# Altium PCB Main_PCB.PcbDoc (part 2 of 2)
Units mil, origin at the board's own origin, x right, y up, seen from the top; angles counter-clockwise.
Board outline 2401.57 x 1732.28 mil, 2 copper layers (Top Layer, Bottom Layer), stack 57 mil thick; 86 components, 54 nets, 243 pads, 73 vias.
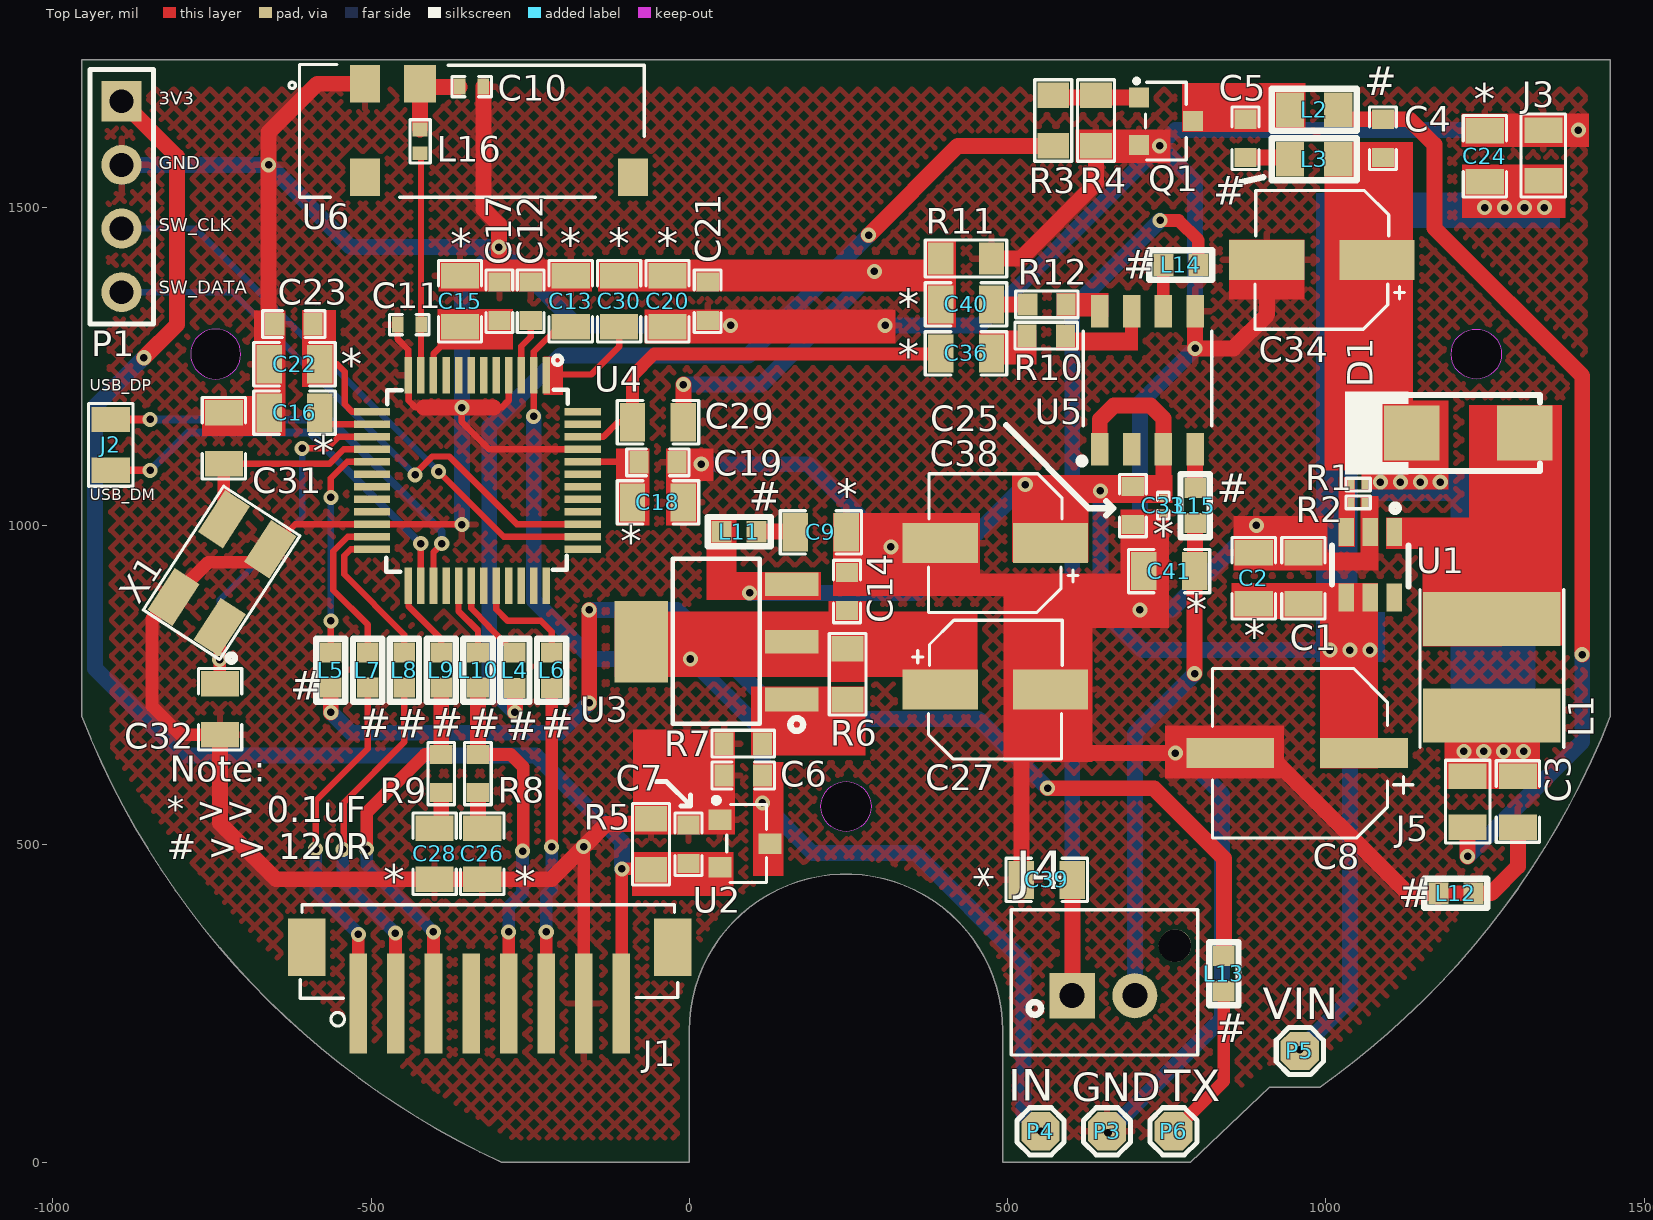
[diagram p0: Top Layer view]

## Part data (continued)
R7: library part RC0603FR-071K8L, "Res Thick Film 0603 1.8K Ohm 1% 0.1W(1/10W) ±100ppm/C Molded SMD Paper T/R", Case Code (Imperial)=0603, Case Code (Metric)=1608, Manufacturer=Yageo, Max Operating Temperature=155°C, Max Power Dissipation=100mW, Min Operating Temperature=-55°C, Package Quantity=5000, Resistance=1.8kR, Resistance Tolerance=1%, Resistor Type="Thick Film", Supplier Part Number 1=311-1.80KHRCT-ND, Temperature Coefficient=100ppm/°C, Voltage Rating=50V, Case/Package=0603, Category="Chip SMD Resistors", ComponentLink1Description=https://datasheet.ciiva.com/11808/0900766b80f96399-11808105.pdf?src-supplier=RSComponents, ComponentLink1URL=https://datasheet.ciiva.com/11808/0900766b80f96399-11808105.pdf?src-supplier=RSComponents, ComponentLink2Description=https://datasheet.ciiva.com/2519/pyu-r-int-thick-7-2519189.pdf?src-supplier=Digi-Key, ComponentLink2URL=https://datasheet.ciiva.com/2519/pyu-r-int-thick-7-2519189.pdf?src-supplier=Digi-Key, ComponentLink3Description=https://datasheet.ciiva.com/7746/443971-7746277.pdf?src-supplier=Element14, ComponentLink3URL=https://datasheet.ciiva.com/7746/443971-7746277.pdf?src-supplier=Element14, ComponentLink4Description=https://datasheet.ciiva.com/2519/pyu-r-int-thick-7-2519190.pdf?src-supplier=Digi-Key, ComponentLink4URL=https://datasheet.ciiva.com/2519/pyu-r-int-thick-7-2519190.pdf?src-supplier=Digi-Key, ComponentLink5Description=https://datasheet.ciiva.com/7746/443971-7746278.pdf?src-supplier=Element14, ComponentLink5URL=https://datasheet.ciiva.com/7746/443971-7746278.pdf?src-supplier=Element14, ComponentLink6Description=https://datasheet.ciiva.com/12558/rc0603-272842-12558694.pdf?src-supplier=Mouser, ComponentLink6URL=https://datasheet.ciiva.com/12558/rc0603-272842-12558694.pdf?src-supplier=Mouser, ComponentLink7Description=https://datasheet.ciiva.com/2519/pyu-r-int-thick-7-2519191.pdf?src-supplier=Digi-Key, ComponentLink7URL=https://datasheet.ciiva.com/2519/pyu-r-int-thick-7-2519191.pdf?src-supplier=Digi-Key, Construction=Rectangular, Depth=0.8mm, Features="Moisture Resistant", Height=0.45mm, Lead Free="Lead Free", Length=1.6mm, Manufacturer Part Number=RC0603FR-071K8L, Military Standard=Not, Number of Pins=2, Number of Terminations=2, Packaging="Tape and Reel", Power Rating=100mW, Pricing 1="1=0.10000, 10=0.02400, 100=0.00970, 1000=0.00436, 2500=0.00378 (USD)", REACH SVHC="No SVHC", RoHS=Yes, RoHS Compliant=Yes, Series=RC, Size Code=0603, Stock 1=827154, Supplier 1=Digi-Key, Technology="THICK FILM", Termination=SMD/SMT, Tolerance=1%, Voltage Rating (DC)=50V, Width=0.8mm
R8 R9: library part RC0603JR-0710RL, "RES SMD 10R 0.1W 0603", Case Code (Imperial)=0603, Case Code (Metric)=1608, Manufacturer=Yageo, Max Operating Temperature=155°C, Max Power Dissipation=100mW, Min Operating Temperature=-55°C, Resistance Tolerance=5%, Resistor Type="Thick Film", Supplier Part Number 1=311-10GRCT-ND, Temperature Coefficient=200ppm/°C, Voltage Rating=50V, Case/Package=0603, Category="Chip SMD Resistors", ComponentLink1Description=https://datasheet.ciiva.com/46395/443971-46395069.pdf?src-supplier=Element14, ComponentLink1URL=https://datasheet.ciiva.com/46395/443971-46395069.pdf?src-supplier=Element14, ComponentLink2Description=https://datasheet.ciiva.com/7746/443971-7746431.pdf?src-supplier=Element14, ComponentLink2URL=https://datasheet.ciiva.com/7746/443971-7746431.pdf?src-supplier=Element14, Construction=Rectangular, Depth=0.8mm, Features="Moisture Resistant", Lead Free="Lead Free", Length=1.6mm, Manufacturer Part Number=RC0603JR-0710RL, Military Standard=Not, Number of Pins=2, Number of Terminations=2, Packaging="Tape and Reel", Power Rating=100mW, Pricing 1="1=0.10000, 10=0.04000, 100=0.01620, 1000=0.00728, 2500=0.00632 (USD)", REACH SVHC="No SVHC", Resistance=10R, RoHS=Yes, RoHS Compliant=Yes, Series=RC, Size Code=0603, Stock 1=1146672, Supplier 1=Digi-Key, Termination=SMD/SMT, Tolerance=5%, Voltage Rating (DC)=50V, Width=0.8mm
R10 R12: library part RC0603JR-0747KL, "RES SMD 47K OHM 5% 1/10W 0603", Case Code (Imperial)=0603, Case Code (Metric)=1608, Manufacturer=Yageo, Max Operating Temperature=155°C, Min Operating Temperature=-55°C, Package Quantity=5000, Power Rating=100mW, Resistance=47kR, Temperature Coefficient=100ppm/°C, Tolerance=5%, Voltage Rating=50V, Case/Package=0603, ComponentLink1Description=http://www.farnell.com/datasheets/443971.pdf, ComponentLink1URL=http://www.farnell.com/datasheets/443971.pdf, ComponentLink2Description=http://www.mouser.com/catalog/specsheets/RC0603.pdf, ComponentLink2URL=http://www.mouser.com/catalog/specsheets/RC0603.pdf, Composition="Thick Film", Depth=0.8mm, Height=0.45mm, Lead Free="Lead Free", Length=1.6mm, Manufacturer Part Number=RC0603JR-0747KL, Military Standard=Not, Number of Pins=2, Packaging="Tape and Reel", Pricing 1="5000=0.0025, 10000=0.0022, 25000=0.0019, 1=0.0011, 6000=0.001 (USD)", REACH SVHC="No SVHC", Stock 1=599135, Supplier 1=Arrow, Supplier Part Number 1=RC0603JR-0747KL, Termination=SMD/SMT, Voltage Rating (DC)=50V, Width=0.8mm
R11: library part RC0805FR-070RL, "Res Thick Film 0805 0 Ohm Epoxy Pad SMD T/R", Case Code (Imperial)=0805, Case Code (Metric)=2012, Manufacturer=Yageo, Max Operating Temperature=155°C, Max Power Dissipation=125mW, Min Operating Temperature=-55°C, Resistance=0mR, Resistor Type="Thick Film", Tolerance=1%, Case/Package=0805, Category="Chip SMD Resistors", ComponentLink1Description=https://datasheet.ciiva.com/17042/rc0805-17042698.pdf?src-supplier=Future+Electronics, ComponentLink1URL=https://datasheet.ciiva.com/17042/rc0805-17042698.pdf?src-supplier=Future+Electronics, ComponentLink2Description=https://datasheet.ciiva.com/15189/getdatasheetpartid-348154-15189885.pdf?src-supplier=Verical, ComponentLink2URL=https://datasheet.ciiva.com/15189/getdatasheetpartid-348154-15189885.pdf?src-supplier=Verical, Construction=Rectangular, Contact Plating=Tin,Matte, Depth=1.25mm, Features="Moisture Resistant", Lead Free="Lead Free", Length=2mm, Manufacturer Part Number=RC0805FR-070RL, Military Standard=Not, Number of Terminations=2, Packaging="Tape and Reel", Power Rating=125mW, Pricing 1="5000=0.00285, 10000=0.00281, 20000=0.00273, 30000=0.00267, 40000=0.00257, 50000=0.00251, 500000=0.00245 (USD)", Radiation Hardening=No, RoHS=Yes, RoHS Compliant=Yes, Series=RC, Size Code=0805, Stock 1=320000, Supplier 1=Avnet, Supplier Part Number 1=RC0805FR-070RL
U1: "24V 2A SOT-23-6 DC-DC Converters RoHS", Manufacturer=SHOUDING, Package=SOT-23-6, ComponentLink1Description="Supplier link", ComponentLink1URL=https://lcsc.com/product-detail/DC-DC-Converters_SDB628_C77805.html, Manufacturer Part No=SDB628
U2: "IC REG LINEAR 3.3V 200MA SOT23", Case/Package=TO-236-3, Dropout Voltage=680mV, Manufacturer=Torex, Max Input Voltage=6V, Max Operating Temperature=85°C, Max Supply Current=3uA, Min Operating Temperature=-40°C, Min Output Voltage=3.3V, Output Current=200mA, Category="Voltage Regulators - Linear", ComponentLink1Description=https://www.torexsemi.com/file/xc6206/XC6206.pdf?src-supplier=Digi-Key, ComponentLink1URL=https://www.torexsemi.com/file/xc6206/XC6206.pdf?src-supplier=Digi-Key, Manufacturer Part Number=XC6206P332MR-G, Mount="Surface Mount", Number of Regulators=1, Output Configuration=Positive, Output Type=Fixed, Pricing 1="3000=0.23146, 6000=0.22820, 12000=0.22168, 18000=0.21679, 24000=0.20864, 30000=0.20375, 300000=0.19886 (USD)", Quiescent Current=3uA, RoHS=Yes, RoHS Compliant=Yes, Supplier 1=Avnet, Supplier Part Number 1=XC6206P332MR-G
U3: "PMIC - LDO voltage regulator Texas Instruments LM1117MPX-ADJ/NOPB Positivbe, adjustable SOT 223", Case/Package=SOT-223, Current Rating=800mA, Dropout Voltage=1.2V, Manufacturer="TI National Semiconductor", Max Input Voltage=15V, Max Operating Temperature=125°C, Max Output Voltage=13.8V, Max Supply Current=10mA, Min Input Voltage=2.6V, Min Operating Temperature=0°C, Min Output Voltage=1.25V, Output Voltage Accuracy=1%, Package Quantity=2000, Power Supply Rejection Ratio (PSRR)=75dB, Quiescent Current=5mA, Reference Voltage=1.262V, Supplier Part Number 1=926-LM1117MPXADJNOPB, Accuracy=1%, Category="Voltage Regulators - Linear", ComponentLink1Description=https://datasheet.ciiva.com/15111/getdatasheetpartid-55626-15111244.pdf?src-supplier=Verical, ComponentLink1URL=https://datasheet.ciiva.com/15111/getdatasheetpartid-55626-15111244.pdf?src-supplier=Verical, ComponentLink2Description=https://datasheet.ciiva.com/3223/lm1117-n-3223530.pdf?src-supplier=Avnet, ComponentLink2URL=https://datasheet.ciiva.com/3223/lm1117-n-3223530.pdf?src-supplier=Avnet, ComponentLink3Description=https://datasheet.ciiva.com/3223/lm1117-n-3223531.pdf?src-supplier=Avnet, ComponentLink3URL=https://datasheet.ciiva.com/3223/lm1117-n-3223531.pdf?src-supplier=Avnet, ComponentLink4Description=https://datasheet.ciiva.com/6596/lm1117-n-6596777.pdf?src-supplier=Digi-Key, ComponentLink4URL=https://datasheet.ciiva.com/6596/lm1117-n-6596777.pdf?src-supplier=Digi-Key, ComponentLink5Description=https://datasheet.ciiva.com/6596/lm1117-n-6596778.pdf?src-supplier=Digi-Key, ComponentLink5URL=https://datasheet.ciiva.com/6596/lm1117-n-6596778.pdf?src-supplier=Digi-Key, ComponentLink6Description=https://datasheet.ciiva.com/6596/lm1117-n-6596779.pdf?src-supplier=Digi-Key, ComponentLink6URL=https://datasheet.ciiva.com/6596/lm1117-n-6596779.pdf?src-supplier=Digi-Key, ComponentLink7Description=https://datasheet.ciiva.com/25980/lm1117-n-25980333.pdf?src-supplier=Avnet+Europe, ComponentLink7URL=https://datasheet.ciiva.com/25980/lm1117-n-25980333.pdf?src-supplier=Avnet+Europe, ComponentLink8Description=https://datasheet.ciiva.com/22710/lm1117-n-22710935.pdf?src-supplier=Element14, ComponentLink8URL=https://datasheet.ciiva.com/22710/lm1117-n-22710935.pdf?src-supplier=Element14, Contact Plating=Tin,Matte, Lead Free="Lead Free", Manufacturer Part Number=LM1117MPX-ADJ/NOPB, Max Output Current=800mA, Min Current Limit=800mA, Mount="Surface Mount", Number of Outputs=1, Number of Pins=4, Number of Regulators=1, Output Configuration=Positive, Output Current=800mA, Output Type=Adjustable, Output Voltage=13.8V, Packaging="Tape and Reel", Polarity=Positive, Pricing 1="1=1.28000, 10=1.15000, 50=1.09000, 100=0.89500, 1000=0.58400, 10000=0.53200 (USD)", Radiation Hardening=No, REACH SVHC="No SVHC", RoHS=Yes, Series=-, Stock 1=273, Supplier 1=Mouser
U4: "High Performance 32-bit Bluetooth Audio P", Manufacturer="MV Silicon", Package=LQFP48, Pitch=0.5mm
U5: "Class D, Class AB 1-Channel (Mono) 11W x 1 @ 4Ω, 9W x 1 @ 4Ω 3V ~ 9V SOP-8_EP_150mil Audio Power OpAmps RoHS", Manufacturer=Manufacturer, Max Output Power x Channels @ Load="11W x 1 @ 4Ω, 9W x 1 @ 4Ω", Package=SOP-8_EP_150mil, Voltage - Supply="3V ~ 9Vv", Features="Overcurrent Protection, Thermal, Undervoltage Protection", Output Type="1-Channel (Mono)", Type="Class D, Class AB"
U6: "RF ANT 2.4GHZ STAMPED MET SLD", Manufacturer=Proant, Supplier Part Number 1=1532-1001-6-ND, ComponentLink1Description=https://media.digikey.com/pdf/Data%20Sheets/Proant%20PDF's/PRO-OB-440_Dwg.PDF?src-supplier=Digi-Key, ComponentLink1URL=https://media.digikey.com/pdf/Data%20Sheets/Proant%20PDF's/PRO-OB-440_Dwg.PDF?src-supplier=Digi-Key, ComponentLink2Description=http://www.proant.se/files/user/Application%20note%20-%20OnBoard%20SMD%20GNSS%20rev%202.0.pdf?src-supplier=Digi-Key, ComponentLink2URL=http://www.proant.se/files/user/Application%20note%20-%20OnBoard%20SMD%20GNSS%20rev%202.0.pdf?src-supplier=Digi-Key, ComponentLink3Description=http://www.proant.se/files/user/Documents/Datasheet%20-%20OnBoard%20SMD%202400%20MHz%20rev%203.pdf?src-supplier=Digi-Key, ComponentLink3URL=http://www.proant.se/files/user/Documents/Datasheet%20-%20OnBoard%20SMD%202400%20MHz%20rev%203.pdf?src-supplier=Digi-Key, Manufacturer Part Number=PRO-OB-440, Mount="Surface Mount", Number of Bands=1, Packaging="Cut Tape", Pricing 1="1=0.74, 10=0.647, 25=0.608, 100=0.4964, 250=0.46104, 500=0.39238 (USD)", Return Loss=-10dB, Stock 1=23502, Supplier 1=Digi-Key, Termination=Solder
X1: library part 7I24000F20UCG, "24MHz ±20ppm 20pF 40Ω SMD-5032_4P Crystals RoHS", ESR (Equivalent Series Resistance)=40Ω, Frequency Tolerance=±20ppm, Load Capacitance=20pF, Manufacturer="SJK(SHENZHEN CRYSTAL TECH)", Operating Temperature=-40℃~+85℃, Package=SMD-5032_4P, Crystal Type="Passive SMD Crystal", Frequency=24MHz

## Via types
v1: diameter 23.62, hole 11.81, Top Layer to Bottom Layer, 73 vias

## Nets (pads, with @x,y where several pads share a name; then routed paths per layer and width w, separated by ;. In a path a pad name is that pad's centre, name@x,y a point inside that pad or via, vN(x,y) a via of type N, cw(c..) or ccw(c..) an arc to the next point about the centre after c; other vN are vias at no path point)
3V3: C7.1 J1.8 P1.1 R5.2 U2.2 | length 2223.2
  Top Layer w20: J1.8@-106.71,248.42 -106.35,248.77 -106.35,460.65 v1(-106,461) -61.62,461 R5.2
  Top Layer w25: P1.1 -805,1580 -805,1316 v1(-857,1264)
  Bottom Layer w25: v1(-857,1264) -934,1187 -934,776 -797,639 -241,639 -106,504 v1(-106,461)
ADJ: R6.2 R7.2 U3.1 | length 88
  Top Layer w25: 160.83,686.17 248.21,686.17 248.66,685.72
ANT: C11.1 L16.2 U4.11 | length 350
  Top Layer w10: C11.1@-423,1305.5 C11.1@-422.5,1305 ; L16.2 -421.69,1583.99 U4.11
AVD33: C20.1 C21.1 C29.1 C30.1 C40.1 R11.2 | length 814.9
  Top Layer w25: C29.1 v1(-9.34,1221.72) ; C21.1 46.66,1400.72 47.66,1399.72 v1(290.66,1399.72) 374.66,1399.72 R11.2
  Bottom Layer w25: v1(-9.34,1221.72) 112.66,1221.72 v1(290.66,1399.72)
B_LED: J1.2 L8.1 | length 572.4
  Top Layer w10: v1(-544.34,491.72) -543,493.07 -543,565 -447.68,660.32 L8.1 ; v1(-462,360) v1@-461.52,359.52 ; J1.2@-461.52,248.9 J1.2@-461.04,248.42
  Top Layer w20: J1.2@-461.52,248.9 v1@-461.52,359.52
  Bottom Layer w20: v1(-544.34,491.72) -544.34,442.34 v1(-462,360) v1@-461.52,359.52
D_IN: C5.2 L2.2 Q1.3 | length 160.1
  Top Layer w25: Q1.3 793.97,1638.72 C5.2 928.62,1638.72 L2.2
FB: R1.1 R2.1 U1.3
GND: C1.2 C2.2 C3.2 C6.2 C7.2 C8.2 C9.2 C10.2 C11.2 C12.1 C13.2 C14.2 C15.2 C16.1 C17.2 C18.2 C19.2 C20.2 C21.2 C22.2 C23.2 C24.2 C25.2 C26.2 C27.2 C28.2 C31.1 C32.1 C33.2 C34.2 C38.2 C39.2 C41.2 J1.7 J3.2 L12.1 L12.2 P1.2 P3.1 Q1.2 R2.2 R4.2 R5.1 R7.1 R11.1 U1.2 U2.1 U4.4 U4.12 U4.22 U4.45 U5.5 U6.1 X1.2 X1.4 | length 10135.5
  Top Layer w10: X1.2 -619.32,1002.25 U4.22 -358.25,1002.25 v1@-358,1002 ; C11.2 -458.5,1293.5 -441.38,1276.38 U4.12 -441,1236.2 -441,1196.38 -430.34,1185.72 -417.34,1185.72 ; v1(-357.34,1185.72) -357.34,1163 -314.71,1120.36 U4.45 ; -307.93,1185.72 -294.93,1185.72 -283.9,1196.76 U4.4 ; v1(-166.03,496.03) -165.9,495.9 v1@-165.9,495.63 ; J1.7@-165.9,248.55 J1.7@-165.76,248.42
  Top Layer w20: C32.1 -799.34,671.72 -844.34,716.72 -844.34,854.22 X1.4 -755.84,942.72 X1.2@-661.34,942.72 ; J1.7@-165.9,248.55 v1@-165.9,495.63
  Top Layer w25: C32.1 -737.34,532.72 -649.34,444.72 C28.2 C26.2 -216.8,444.72 v1@-165.9,495.63 ; C23.2@-661.34,1310 -661.34,1617.66 -584.57,1694.43 U6.1 ; -417.34,1185.72 v1(-357.34,1185.72) -307.93,1185.72 ; C10.2 -323.5,1497.5 -299.34,1473.34 v1(-299.34,1437.72) -299.34,1383.72 C17.2 ; v1(-166.03,496.03) -130.34,531.72 R5.1@-60.34,531.72 ; v1(64.66,1314.72) v1(307.66,1314.72) ; R11.1 520.66,1419.72 638.66,1537.72 R4.2 ; C39.2 521.66,674.66 524,677 ; C27.2 567.27,704.11 628.66,642.72 v1(763.66,642.72) C8.2 908.28,642.72 1128.28,422.72 L12.1 L12.2 1259.66,422.72 1301.66,464.72 C3.2 ; C41.2@696.66,945.72 C41.2 ; U5.5 v1(794.66,1278.72) 854.66,1278.72 907.66,1331.72 907.66,1368.72 ; J3.2@1340.66,1620.72 J3.2
  Bottom Layer w25: P1.2 v1(-661,1567) -531.72,1437.72 v1(-299.34,1437.72) ; v1@-357.34,1003 v1(-357.34,1185.72) -357.34,1379.72 v1(-299.34,1437.72) ; v1(18.66,1096.72) 186.66,1096.72 v1(316.66,966.72) ; v1(64.66,1314.72) -176.34,1314.72 v1(-299.34,1437.72) ; v1(307.66,1314.72) 456.66,1314.72 v1(738.66,1596.72) ; v1(657.66,46.72) 837,226.07 837,578 772.28,642.72 v1(763.66,642.72) ; v1(707.66,867.72) v1@707.66,868.72 ; 736.66,1220.72 v1(794.66,1278.72) 794.66,1540.72 v1(738.66,1596.72) ; 760.66,1245.72 707.66,1192.72 v1@707.66,868.72 ; v1(890.66,1000.72) 758.66,868.72 v1@707.66,868.72 ; v1(1396.66,1621.72) 763.66,1621.72 v1(738.66,1596.72)
  other v1: -357.34,1002
IN+: C29.2 C36.1 U4.46 | length 659.8
  Top Layer w10: U4.46 -135.02,1140.05 -112.34,1162.72 C29.2
  Top Layer w20: C29.2 -89.34,1235.72 -55.34,1269.72 394.66,1269.72 C36.1
LDO_IN: C6.1 C13.1 C14.1 C27.1 P4.1 R6.1 U2.3 U3.2 U3.4 U4.2 | length 2076.2
  Top Layer w10: v1(-244.53,1171.72) U4.2 -244.53,1273.54 -205.34,1312.72 C13.1
  Top Layer w25: U3.4@-75.52,776.72 U3.4@-67.52,768.72 ; U3.4 -25.34,817.72 v1(1.66,790.72) ; v1(114.66,564.72) C6.1 ; 160.83,776.72 247.66,776.72 ; C27.1@371.04,765.72 C27.1
  Bottom Layer w25: v1(-244.53,1171.72) -244.53,882.91 -152.34,790.72 v1(1.66,790.72) 114.66,677.72 v1(114.66,564.72) 193.38,486 355.38,486 524.66,316.72 524.66,75.72 v1(551.66,48.72)
LED_EN: L4.1 U4.30 | length 133.6
  Top Layer w10: U4.30 -342.94,870.36 -315.01,842.43 -315.01,841.44 L4.1
LED_GND: C4.2 J5.2 L2.1 | length 1508.4
  Top Layer w25: L2.1 1034.69,1638.72 C4.2 1130.66,1638.72 1170.66,1598.72 1170.66,1467.72 1402.66,1235.72 v1(1402.66,797.72) ; v1(1222.66,480.72) J5.2
  Bottom Layer w25: v1(1222.66,480.72) 1402.66,660.72 v1(1402.66,797.72)
LED_IN: C3.1 C4.1 C34.1 D1.2 J5.1 L1.2 L3.1 R1.2 | length 415.5
  Top Layer w25: L3.1 1022.69,1578.72 C4.1 C4.1@1090.66,1578.72
  Bottom Layer w25: v1(1279.32,645.72) 1279.32,989.06
  other v1: 1216.66,645.72 1247.99,645.72 1310.66,645.72 1085.66,1068.72 1116.99,1068.72 1148.32,1068.72 1179.66,1068.72
NetC5_1: C5.1 L3.2 | length 71.2
  Top Layer w25: C5.1 940.62,1578.72 L3.2
NetC9_1: C9.1 L11.2 | length 59.9
  Top Layer w25: L11.2 C9.1@165.66,990.72
NetC10_1: C10.1 L16.1 U6.2 | length 133.8
  Top Layer w25: L16.1 U6.2@-423.02,1689.43 ; U6.2 U6.2@-423.02,1689.43 ; C10.1@-360.93,1689.43 U6.2@-423.02,1689.43
NetC12_2: C12.2 U4.3 | length 92.3
  Top Layer w10: U4.3 -264.21,1281.86 -249.34,1296.72 C12.2
NetC16_2: C16.2 U4.14 | length 89.3
  Top Layer w10: C16.2 -562.35,1159.73 U4.14
NetC26_1: C26.1 R8.1 | length 54
  Top Layer w25: C26.1@-332.34,526.72 R8.1
NetC28_1: C28.1 R9.1 | length 53
  Top Layer w25: C28.1@-389.84,527.72 R9.1
NetC30_2: C30.2 U4.1 | length 140.2
  Top Layer w10: -201.34,1237.72 -154.34,1237.72 -110.34,1281.72 C30.2
NetC36_2: C36.2 R10.2
NetC40_2: C40.2 R12.2 | length 57
  Top Layer w25: C40.2 R12.2
NetL4_2: L4.2 R3.2 | length 1572.7
  Top Layer w25: v1(-274.18,706.89) L4.2 ; v1(281.66,1456.72) 421.66,1596.72 R3.2
  Bottom Layer w25: v1(-274.18,706.89) -314.34,747.06 -314.34,1155.72 -202.34,1267.72 92.66,1267.72 v1(281.66,1456.72)
NetL5_2: L5.2 U4.17 | length 349.6
  Top Layer w10: L5.2 v1(-563.34,850.72) ; v1(-563.34,1044.72) -563.34,1074.72 -537.39,1100.68 U4.17
  Bottom Layer w10: v1(-563.34,850.72) v1(-563.34,1044.72)
NetL6_1: L6.1 U4.32 | length 171.7
  Top Layer w10: U4.32 -303.57,868.95 -285.62,851 -233.62,851 -216.34,833.72 L6.1
NetL7_2: L7.2 U4.23 | length 251.6
  Top Layer w10: L7.2 -505.51,844.89 -559.34,898.72 -559.34,959.77 -536.54,982.57 U4.23
NetL8_2: L8.2 U4.24 | length 239.2
  Top Layer w10: U4.24 -532.19,962.88 -542.34,952.72 -542.34,923.72 -447.68,829.06 L8.2
NetL9_2: L9.2 U4.25 | length 126.3
  Top Layer w10: U4.25 -441.34,873.72 -389.84,822.22 L9.2
NetL10_2: L10.2 U4.29 | length 117.7
  Top Layer w10: U4.29 -362.62,866 -332.01,835.39 L10.2
NetL13_2: L13.2 P6.1 | length 252.7
  Top Layer w20: P6.1 839.66,127.72 L13.2
NetL14_1: L14.1 U5.6 | length 72.8
  Top Layer w20: L14.1 744.66,1409.61 U5.6
NetL15_1: L15.1 U5.4 | length 61.2
  Top Layer w25: L15.1 U5.4
NetQ1_1: Q1.1 R3.1 R4.1 | length 136.2
  Top Layer w25: R3.1 575.25,1673.13 Q1.1
NetR10_1: R10.1 U5.7 | length 50.6
  Top Layer w20: R10.1@590.66,1294.4 R10.1 ; 694.66,1290.72 U5.7
NetR12_1: R12.1 U5.8 | length 57.4
  Top Layer w20: R12.1 633.92,1347.72 U5.8
PLAY_KEY: J1.6 L6.2 | length 500.7
  Top Layer w20: J1.6@-224.83,248.43 v1(-224.83,362) ; v1(-216.34,495.66) L6.2
  Bottom Layer w10: v1@-225,362.17 v1(-224.83,362)
  Bottom Layer w20: v1@-225,362.17 -225,420 -216.34,428.66 v1(-216.34,495.66)
RF3V3: C22.1 C23.1 U4.13 | length 142.5
  Top Layer w10: C22.1 -553.34,1253.72 -541.34,1241.72 -541.34,1190.72 -530.04,1179.42 U4.13
SPK_N: C41.1 J4.2 L15.2 | length 781.6
  Top Layer w25: v1(793.66,767.72) C41.1 794.66,929.72 L15.2
  Bottom Layer w25: J4.2 699.87,673.94 v1(793.66,767.72)
SPK_P: C39.1 J4.1 L14.2 | length 1569.2
  Top Layer w20: v1(739.66,1479.72) 768.66,1479.72 799.66,1448.72 L14.2
  Top Layer w25: J4.1 601.66,261.94 C39.1
  Bottom Layer w25: J4.1 601.44,1341.51 v1(739.66,1479.72)
SW: D1.1 L1.1 U1.1
SW_CLK: P1.3 U4.38 | length 925
  Top Layer w10: v1(-394,1085) -291.57,982.57 U4.38
  Bottom Layer w10: P1.3 -776,1467 v1(-394,1085)
SW_DATA: P1.4 U4.39 | length 900.3
  Top Layer w10: v1(-431,1080) -431,1081.67 -403.86,1108.81 -377.47,1108.81 -270.91,1002.25 U4.39
  Bottom Layer w10: P1.4 -718,1367 v1(-431,1080)
T_LED1: J1.1 L7.1 | length 558.4
  Top Layer w10: v1(-587,492) -587,568 -505.51,649.49 L7.1
  Top Layer w20: J1.1@-520.09,248.42 v1@-520.09,358
  Bottom Layer w20: v1(-587,492) -587,426 v1@-519.5,358.5
  other v1: -520,358
TCH_TX: L5.1 L13.1 | length 1933.3
  Top Layer w25: v1(-563.35,706.89) L5.1@-563.35,743.12 ; v1(-157.34,721.72) v1(-157.34,867.72) ; v1(562.66,587.72) 729.66,587.72 839.66,477.72 L13.1
  Bottom Layer w25: v1(-563.35,706.89) -531.35,674.89 -204.18,674.89 v1(-157.34,721.72) ; v1(-157.34,867.72) -19.34,867.72 151.66,696.72 453.66,696.72 v1(562.66,587.72)
TKEY1: J1.3 L9.1 R9.2 | length 604.2
  Top Layer w20: v1(-507,492) -507,549.07 -415.34,640.72 R9.2 ; J1.3@-401.99,248.43 v1@-401.99,361.99
  Top Layer w25: R9.2 L9.1
  Bottom Layer w20: v1(-507,492) -507,467 v1(-402,362)
TKEY2: J1.5 L10.1 R8.2 | length 566.4
  Top Layer w20: R8.2 -332.01,640.72 -280.72,640.72 -261,621 -261,490 v1(-262,489) ; J1.5@-283.88,248.43 v1(-283.89,362)
  Top Layer w25: R8.2@-332.01,640.72 L10.1
  Bottom Layer w20: v1(-283.89,362) -283.89,401.11 -262,423 v1(-262,489)
USB_DM: J2.1 U4.26 | length 650.4
  Top Layer w10: v1(-422,972) -422,906.04 U4.26
  Top Layer w12: J2.1 v1(-847,1087)
  Bottom Layer w12: v1(-847,1087) -787.47,1146.53 -596.54,1146.53 v1(-422,972)
USB_DP: J2.2 U4.27 | length 683.6
  Top Layer w10: U4.27 -401.99,958.34 -389,971.33 v1(-389,972)
  Top Layer w12: J2.2 v1(-847,1167)
  Bottom Layer w12: v1(-847,1167) -565,1167 -389,991 v1(-389,972)
VDD_3V3: C15.1 C17.1 U4.10 | length 93.4
  Top Layer w10: U4.10 -402.01,1270.06 -360.34,1311.72 C15.1
VIN: C1.1 C2.1 C8.1 C24.1 C25.1 C33.1 C38.1 J3.1 L11.1 P5.1 U1.4 U1.5 U3.3 U5.1 U5.3 | length 2016.8
  Top Layer w25: U5.1 644.66,1166.72 666.66,1188.72 724.66,1188.72 744.66,1168.72 U5.3 744.66,1052.72 ; C24.1 C24.1@1250.66,1541.72
  Bottom Layer w25: v1(94.66,894.72) 357.66,894.72 v1(527.66,1064.72) ; v1(645.66,1054.72) 645.66,870.72 711.66,804.72 v1(1006.32,804.72) ; v1(959,177) 1037.66,255.66 v1(1037.66,804.72)
  other v1: 1068.99,804.72 1249.32,1499.72 1280.66,1499.72 1311.99,1499.72 1343.32,1499.72
VMID: C18.1 C19.1 U4.44 | length 88.7
  Top Layer w10: U4.44 -80.3,1100.68 C19.1
XI: C32.2 U4.15 X1.1 | length 592.5
  Top Layer w10: v1(-608.34,1121.72) -569.37,1121.72 -551.05,1140.05 U4.15
  Top Layer w20: X1.1 -737.69,752.07 C32.2
  Bottom Layer w10: v1(-737.98,789.77) -737.98,883.6 -608.34,1013.23 v1(-608.34,1121.72)
XO: C31.2 U4.16 X1.3 | length 329.7
  Top Layer w10: C31.2 -565.34,1097.72 -542.71,1120.36 U4.16
  Top Layer w20: C31.2 -731.34,1010.74 X1.3
pads on no net: J1.4 J1.MP1 J1.MP2 J4.3 U1.6 U4.5 U4.6 U4.7 U4.8 U4.9 U4.18 U4.19 U4.20 U4.21 U4.28 U4.31 U4.33 U4.34 U4.35 U4.36 U4.37 U4.40 U4.41 U4.42 U4.43 U4.47 U4.48 U5.2 U6.3 U6.4

## Polygon pours and split planes (outlines as drawn)
GND on Top Layer "GND_L01_P001" (hatched 45Degree grid 20 track 8, remove dead copper, pour order 1): -277.24,38 -19,38 -19,224 cw(c245,215.35) 509,206.69 509,38 779.55,38 902.76,155 978.85,155 ccw(c-52.43,1405.03) 1408,702.71 1408,1686 -915.13,1686 -906.34,649.02 ccw(c594.44,1564.84)
GND on Bottom Layer "GND_L02_P003" (hatched 45Degree grid 20 track 8, remove dead copper, pour order 3): -277.24,38 -19,38 -19,224 cw(c245,215.35) 509,206.69 509,38 779.55,38 902.76,155 978.85,155 ccw(c-52.43,1405.03) 1408,702.71 1408,1686 -915.13,1686 -906.34,649.02 ccw(c594.44,1564.84)

## Other copper
Top Layer:
  rectangle net GND: 747,603 934,686
  rectangle net GND: 434.66,889.72 677.66,924.72
  rectangle net GND: -36.34,1070.72 37.66,1121.72
  rectangle net SW: 1151.66,810.72 1276.66,1012.72
  rectangle net 3V3: -90.34,418.72 69.66,487.72
  rectangle net GND: -88.34,514.72 71.66,679.72
  rectangle net VIN: 26.66,883.72 73.66,1008.72
  region net VIN: 31.66,927.72 31.66,883.72 206.66,883.72 206.66,927.72
  rectangle net ADJ: 96.66,638.72 276.66,747.72
  rectangle net LDO_IN: 99.66,449.72 147.66,628.72
  region net LDO_IN: 452.66,762.72 452.66,865.72 -117.34,865.72 -117.34,762.72
  rectangle net LDO_IN: 218.66,754.72 278.66,881.72
  rectangle net GND: 493.66,628.72 633.66,905.72
  rectangle net GND: 493.66,839.72 753.66,924.72
  rectangle net GND: 225.66,889.72 456.66,1019.72
  rectangle net GND: 854.66,929.72 1002.66,1015.72
  rectangle net GND: 856.66,929.72 1082.66,957.72
  rectangle net GND: 677.66,892.72 753.66,1025.72
  rectangle net VIN: 506.66,942.72 626.66,1079.72
  rectangle net VIN: 507.66,1035.72 758.66,1079.72
  rectangle net GND: 847.66,1355.72 966.66,1449.72
  rectangle net NetR10_1: 575.66,1275.4 704.66,1303.72
  rectangle net NetR12_1: 576.66,1328.72 658.66,1365.72
  rectangle net LED_IN: 1209.66,628.54 1235.66,708.54
  rectangle net LED_IN: 997.66,1086.72 1136.66,1602.72
  region net LED_IN: 1192.66,1196.72 1055.66,1196.72 1055.66,1056.72 1192.66,1056.72
  rectangle net VIN: 990.66,618.72 1081.66,901.72
  region net SW: 1094.66,1012.72 1094.66,963.72 1234.66,963.72 1234.66,1012.72
  rectangle net GND: 1054.66,930.72 1082.66,1046.72
  rectangle net FB: 1019.66,966.72 1045.66,1076.72
  rectangle net VIN: 851.66,853.72 1081.66,909.72
  region net SW: 1370.66,811.72 1370.66,1189.72 1224.66,1189.72 1224.66,811.72
  region net LED_IN: 1186.66,742.72 1186.66,586.72 1336.66,586.72 1336.66,742.72
  region net GND: 1212.66,1647.72 1212.66,1594.72 1413.66,1594.72 1413.66,1647.72
  region net VIN: 1213.66,1567.72 1213.66,1483.72 1376.66,1483.72 1376.66,1567.72
  rectangle net D_IN: 773.66,1618.72 968,1695.72
  region net GND: 606.66,1622.72 606.66,1569.72 755.66,1569.72 755.66,1622.72
  region net GND: -70.34,1339.72 -70.34,1286.72 323.66,1286.72 323.66,1339.72
  rectangle net NetC30_2: -229.34,1205.72 -198.34,1265.72
  region net RF3V3: -555.34,1338.72 -608.34,1338.72 -608.34,1217.72 -555.34,1217.72
  region net GND: -766,1203.72 -766,1140.72 -634.34,1140.72 -634.34,1203.72
  region net GND: -634.34,1338 -684.34,1338 -684.34,1142.72 -634.34,1142.72
  region net VDD_3V3: -395.34,1340.72 -395.34,1276.72 -277.34,1276.72 -277.34,1340.72
  region net VMID: -62.34,1121.72 -115.34,1121.72 -115.34,1000.72 -62.34,1000.72
  rectangle net GND: -36.34,1000.72 16.66,1121.72
  rectangle net NetC36_2: 454.66,1253.72 545.66,1306.72
  region net AVD33: 369.66,1449.72 369.66,1311.72 418.66,1311.72 418.66,1449.72
  rectangle net AVD33: -143.34,1367.72 417.66,1418.72
  rectangle net GND: -394.34,1367.72 -153.34,1418.72
Bottom Layer:
  rectangle net LED_IN: 1071.66,1038.72 1329.66,1089.72
  rectangle net LED_IN: 1195.66,630.72 1329.66,1089.72
  region net VIN: 993.66,864.72 993.66,785.72 1092.66,785.72 1092.66,864.72
  region net VIN: 984.66,1522.72 984.66,785.72 1049.66,785.72 1049.66,1522.72
  rectangle net VIN: 994.66,1467.72 1367.66,1523.72

## Silkscreen, mask and mechanical layers (free items; w line width, h text height)
Top Overlay:
  lines w8: -52,598 -36,598 2,560 ; -13,560 2,560 ; 2,577 2,560
  lines w10: 497.66,1157.72 627.66,1027.72 665.66,1027.72 ; 654.66,1016.72 665.66,1027.72 ; 654.66,1038.72 665.66,1027.72 ; 865.66,1539.72 901.66,1547.72
  text "#" at 1060,1676 h45
  text "3V3" at -834,1654 h35
  text "*" at 1232.66,1645.72 h50
  text "GND" at -833.59,1552.72 h35
  text "#" at 822.66,1504.72 h45
  text "SW_CLK" at -833.59,1455.72 h35
  text "*" at -203.34,1418.72 h50
  text "*" at -127.34,1418.72 h50
  text "*" at -51.34,1418.72 h50
  text "*" at -375.34,1417.72 h50
  text "#" at 681.66,1387.72 h45
  text "SW_DATA" at -833.59,1357.72 h35
  text "*" at 327.66,1322.72 h50
  text "*" at 327.66,1243.72 h50
  text "*" at -547.34,1229.72 h50
  text "USB_DP" at -942,1206 h30
  text "*" at -592,1093 h50
  text "#" at 828.66,1036.72 h45
  text "USB_DM" at -942,1034 h30
  text "*" at 230.66,1024.72 h50
  text "#" at 93.66,1023.72 h45
  text "*" at 727.66,962.72 h50
  text "*" at -108.34,951.72 h50
  text "*" at 779.66,843.72 h50
  text "*" at 870.66,802.72 h50
  text "#" at -627.34,726.72 h45
  text "#" at -406.34,668.72 h45
  text "#" at -519.34,667.72 h45
  text "#" at -347.34,667.72 h45
  text "#" at -462.34,666.72 h45
  text "#" at -232.34,666.72 h45
  text "#" at -288.34,662.72 h45
  text "Note:" at -816.34,584.72 h70
  text "* >> 0.1uF" at -821.34,520.96 h70
  text "# >> 120R" at -821.34,462.96 h70
  text "*" at 496.66,430.72 h50 r90
  text "*" at -481,419 h50
  text "*" at -275,416 h50
  text "#" at 1113.66,400.72 h45
  text "VIN" at 901,225 h50
  text "#" at 825.66,188.72 h45
  text "IN" at 500.66,96.72 h50
  text "GND" at 600.66,95.72 h45
  text "TX" at 745.66,95.72 h50
Bottom Overlay:
  drawing of 3074 lines, arcs and shapes, not listed
  text "ZERO CARBON FOOTPRINT" at 773.66,710.72 h38
Mechanical 2:
  circle w7: c-744.09,1269.69 r39.37
  circle w7: c246.06,559.06 r39.37
  circle w7: c1236.22,1269.69 r39.37
  lines w7: -954.72,700.79 ccw(c246.06,1170.08) -784.46,395.39 ccw(c245.11,1168.89) -295.28,0 0,0 0,206.69 cw(c246.06,206.69) 492.13,206.69 492.13,0 787.4,0 911.78,118.11 990.52,118.11 ccw(c236.68,1181.16) 1096.64,201.97 ccw(c251.62,1167.48) 1382.68,561.71 ccw(c246.06,1170.45) 1446.85,700.79 1446.85,1732.28 -954.72,1732.28 -954.72,700.79

## Dimensions
787.4,0 to 1446.85,1732.28 on Mechanical 1
1446.85,1732.28 to -954.72,1732.28 on Mechanical 1
1446.85,700.79 to 1446.85,1732.28 on Mechanical 1